# Altium PCB AnanasSTM32.PcbDoc
Units mm, origin at the board's own origin, x right, y up, seen from the top; angles counter-clockwise.
Board outline 41.4 x 42 mm, 2 copper layers (Top Layer, Bottom Layer); 57 components, 52 nets, 207 pads, 38 vias.
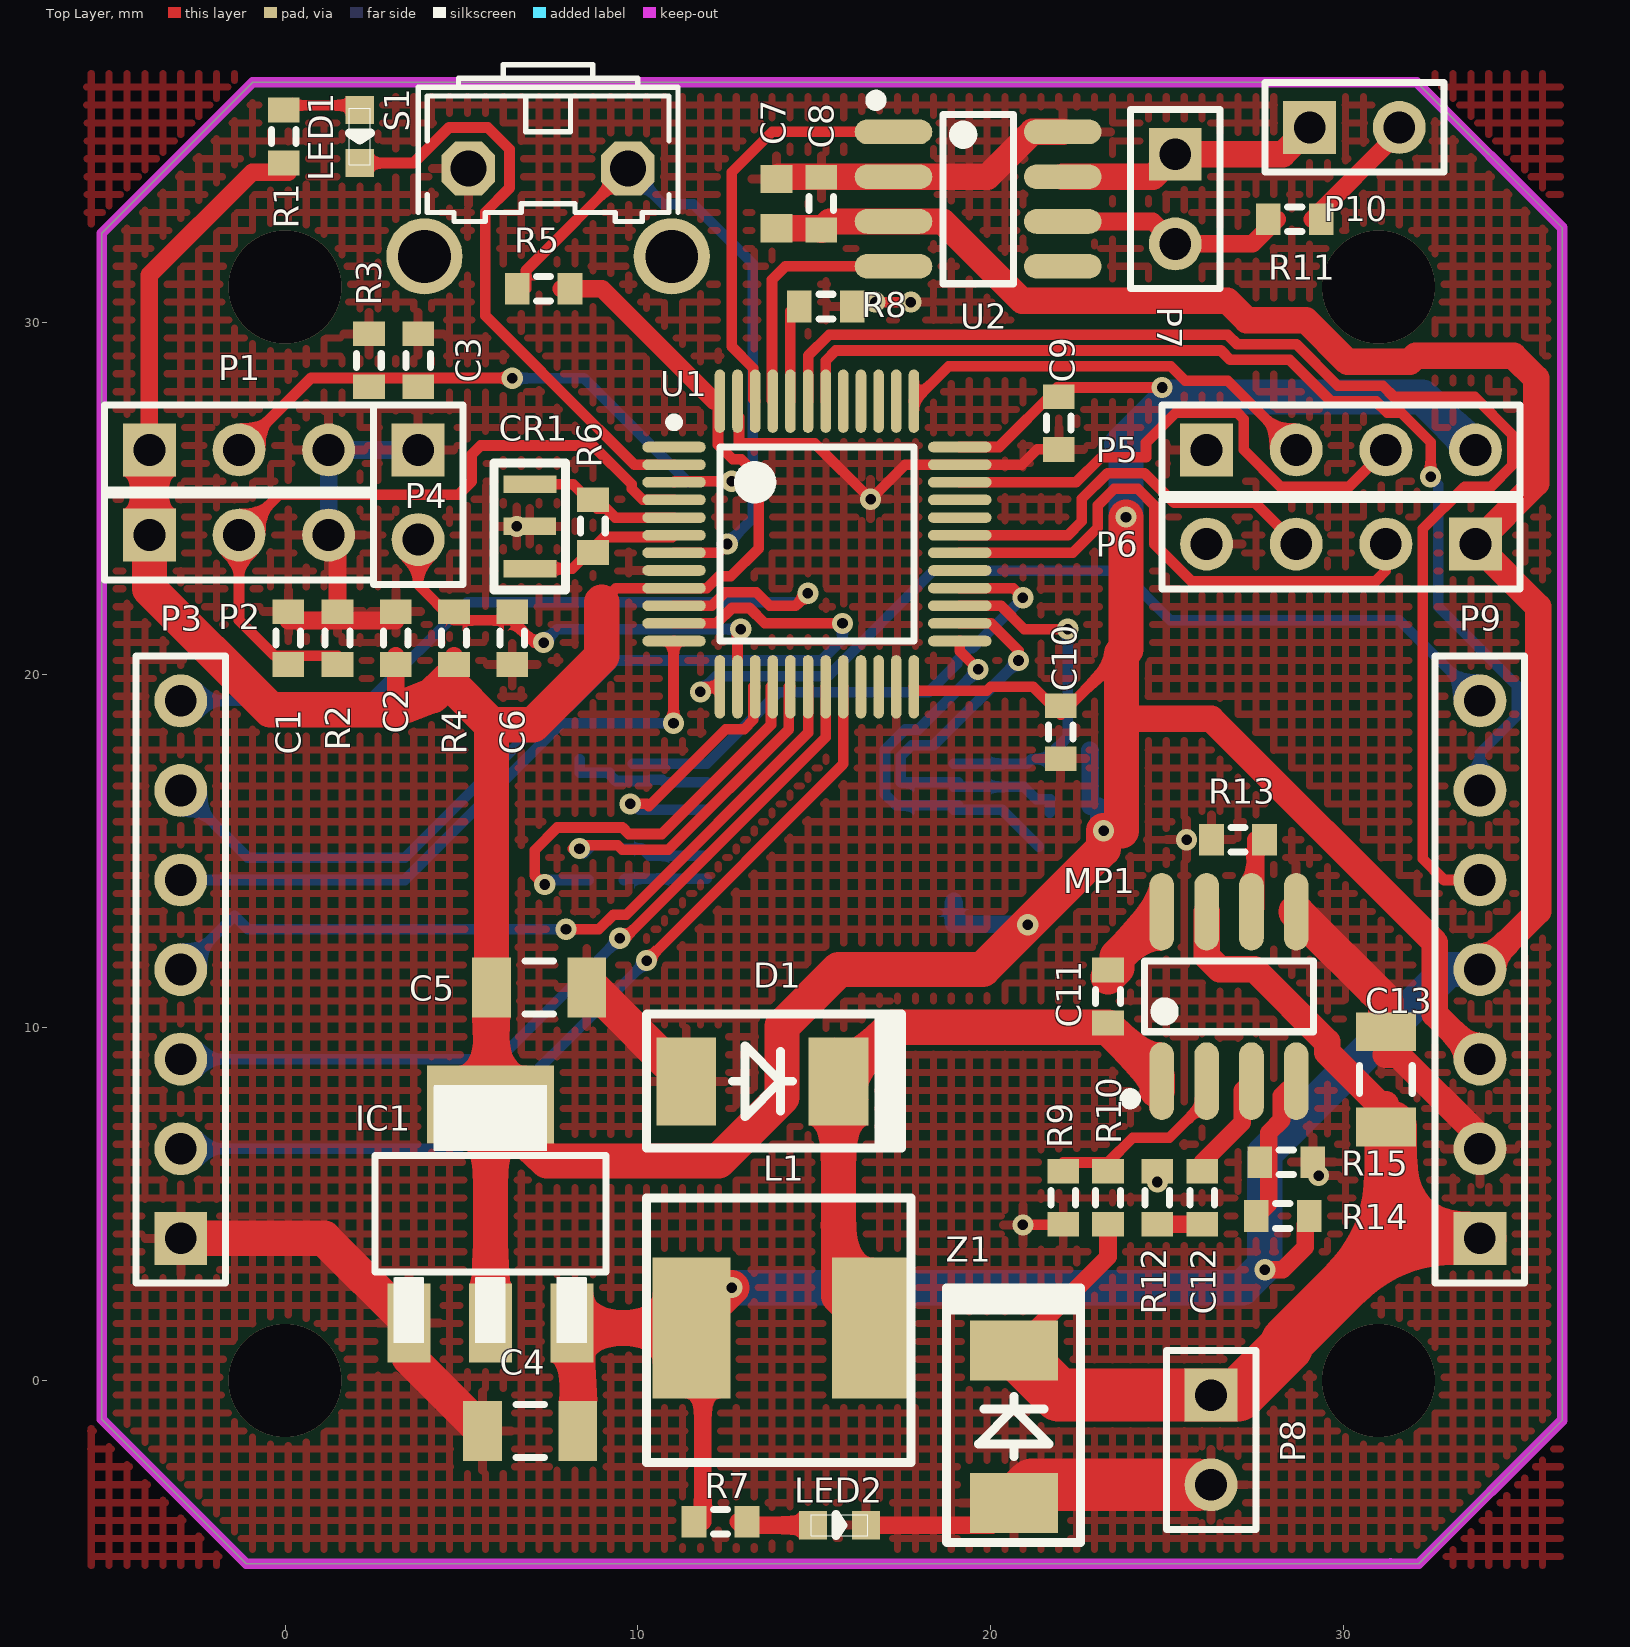
[diagram p0: Top Layer view]
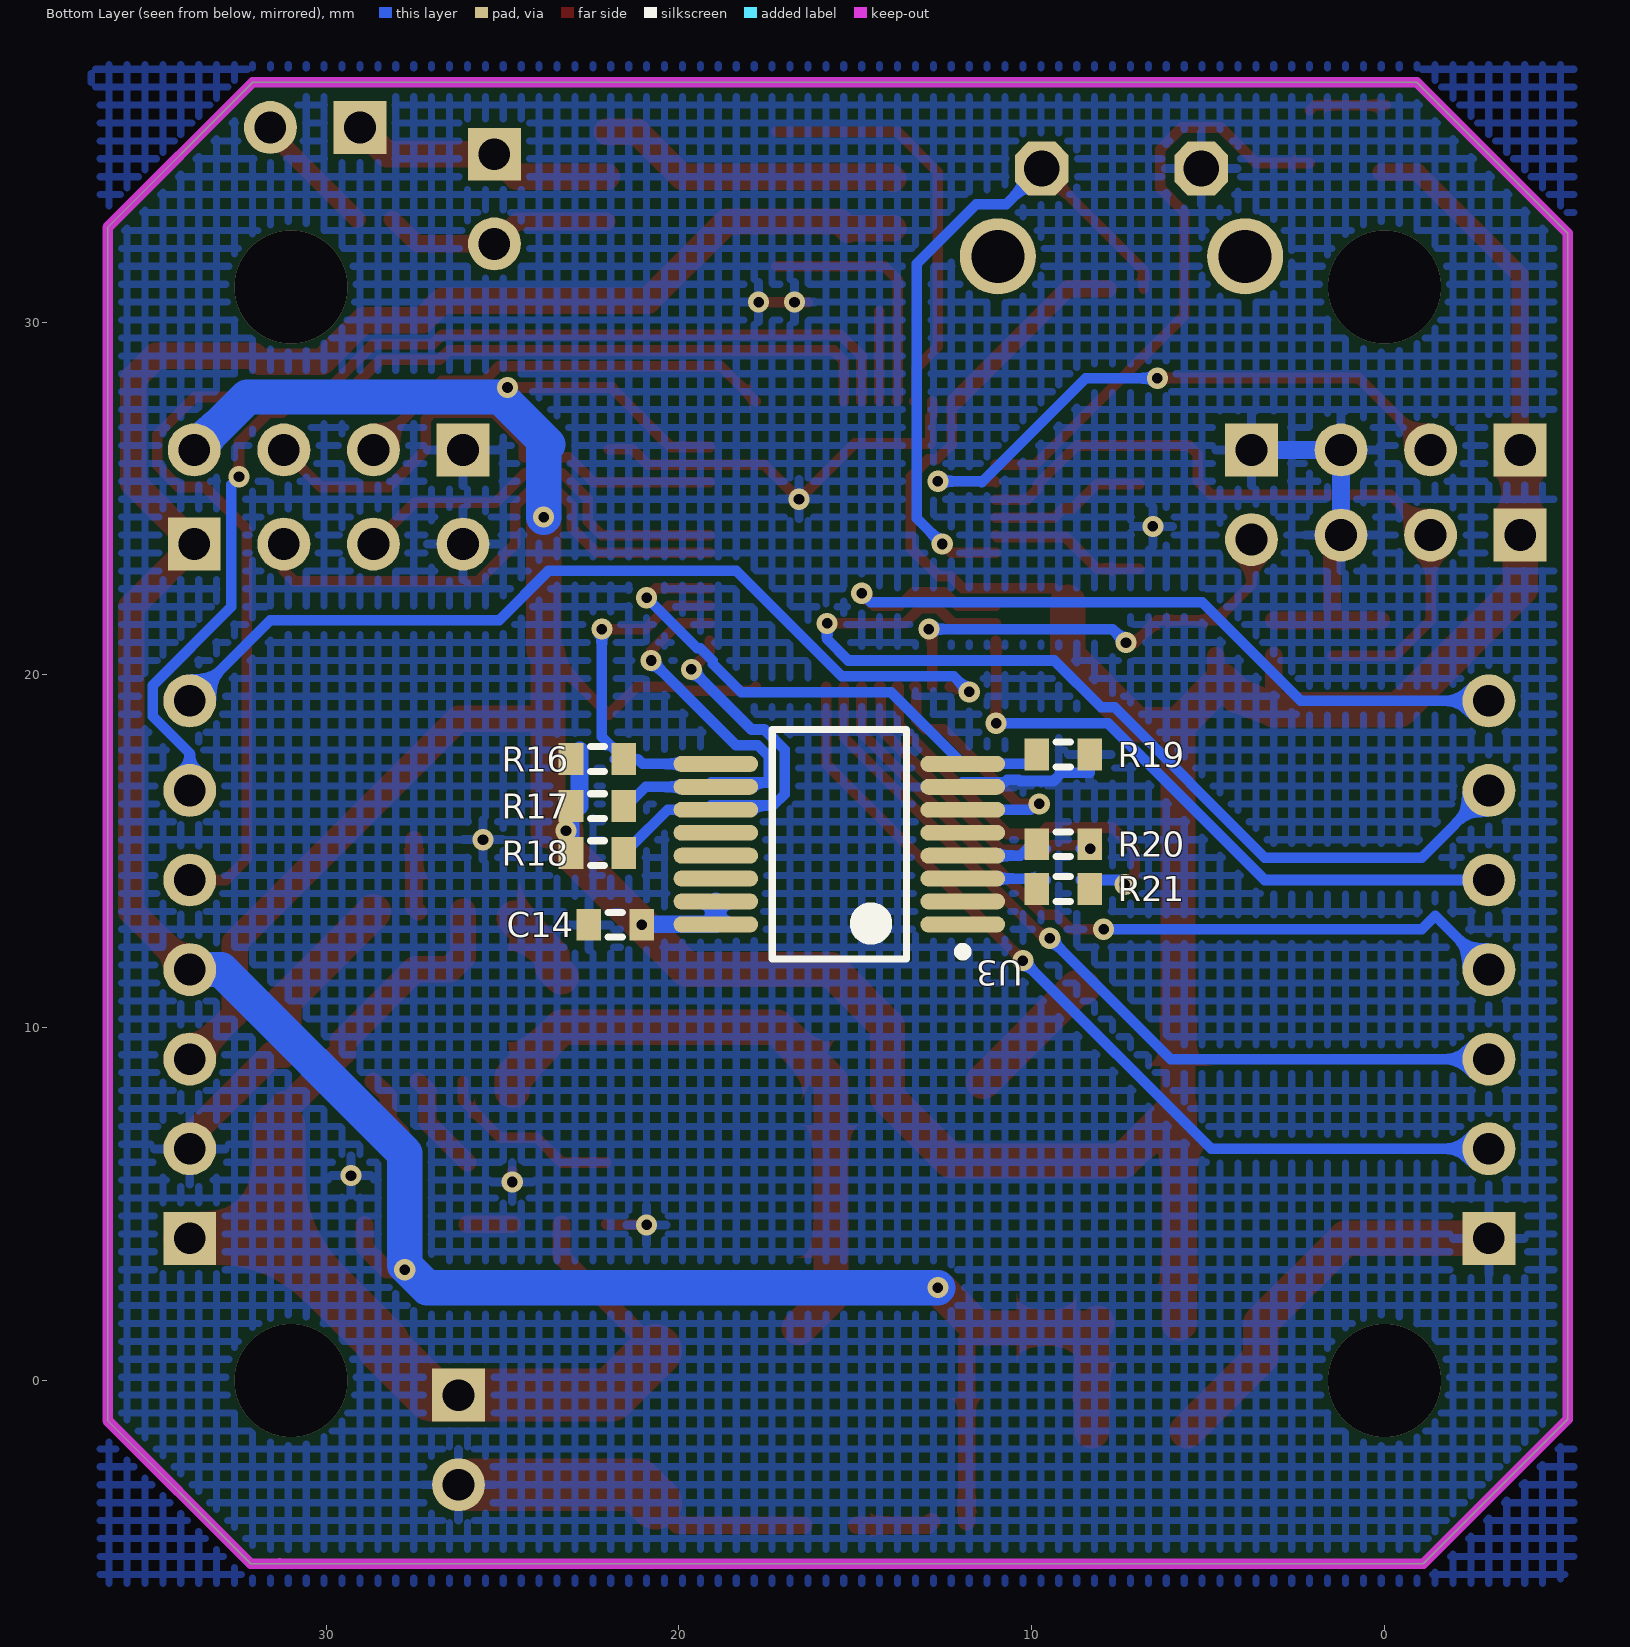
[diagram p1: Bottom Layer view, seen from below]

## Layer stack, top to bottom
Top Solder: solder mask 0.0102, Solder Resist, Dk 3.5
Top Layer: signal copper 0.0356
Dielectric 1: dielectric 0.32, FR-4, Dk 4.8
Bottom Layer: signal copper 0.0356
Bottom Solder: solder mask 0.0102, Solder Resist, Dk 3.5

## Board outline
-1.101,-5.2 -5.2,-1.101 -5.2,32.519 -0.919,36.8 32.083,36.8 36.2,32.683 36.2,-1.138 32.138,-5.2

## Design rules (kind name [scope] priority, off if disabled: settings)
Clearance [All] p1: gap=0.15 ignorepadtopadclearanceinfootprint=FALSE except(0: Arc-Hole Track-Hole SMDPad-Hole THPad-Hole Via-Hole Fill-Hole Poly-Hole Region-Hole Text-Hole)
DiffPairsRouting [All] p1: maxlimit=0.254 minlimit=0.254 mostfreqgap=0.254 toplayer_minwidth=0.381 toplayer_maxwidth=1 toplayer_prefwidth=0.381 bottomlayer_minwidth=0.381 bottomlayer_maxwidth=1 bottomlayer_prefwidth=0.381 maxuncoupledlength=12.7
HoleSize [All] p1 off: absolutevalues=TRUE maxlimit=5 minlimit=0.025 maxpercent=80.000 minpercent=20.000
HoleToHoleClearance [All] p1 off: gap=0.254 allowstackedmicrovias=TRUE
MinimumSolderMaskSliver [All] p1: minsoldermaskwidth=0.1
PolygonConnect [All] p1: connectstyle=Relief reliefconductorwidth=0.254 reliefentries=4 polygonreliefangle="90 Angle" airgapwidth=0.254
RoutingVias [All] p1: holewidth=0.3 width=0.6 viastyle="Through Hole" minholewidth=0.3 minwidth=0.6 maxholewidth=0.711 maxwidth=1.27
SilkToBoardRegionClearance [All] p1 off:
SilkToSilkClearance [All] p1 off: silktosilkclearance=0
SilkToSolderMaskClearance [IsPad] p1 off: minsilkscreentomaskgap=0 clearancetoexposedcopper=TRUE
SolderMaskExpansion [All] p1 off: expansion=0.1
Width [All] p1: maxlimit=1.5 minlimit=0.2 preferedwidth=0.203 toplayer_minwidth=0.203 minimp=50.000000 maximp=50.000000 favimp=50.000000
23 further rules are at their usual default settings.

## Classes and differential pairs
differential pair CAN: +CAN_P -CAN_N

## Components (designator, comment, footprint, x,y, rotation, side; value= is the part's Value field where it differs from the comment)
C1 "100pF" J1-0603 0.088,21.043 r270 top (schematic designator C12)
C2 "100pF" J1-0603 3.136,21.043 r270 top (schematic designator C9)
C3 "100pF" J1-0603 3.771,28.917 r270 top (schematic designator C14)
C4 "22uF" C1206 6.946,-1.436 r0 top (schematic designator C15)
C5 "22uf" C1206 7.2,11.137 r180 top (schematic designator C2)
C6 "10uF" J1-0603 6.438,21.043 r90 top (schematic designator C13)
C7 "10uF" 1608[0603] 13.931,33.362 r90 top (schematic designator C1)
C8 "100pF" J1-0603 15.201,33.362 r90 top (schematic designator C10)
C9 "4uF7" J1-0603 21.932,27.139 r90 top (schematic designator C7)
C10 "100pF" J1-0603 21.985,18.376 r90 top (schematic designator C8)
C11 "100pF" J1-0603 23.329,10.883 r270 top (schematic designator C4)
C12 "150pF" J1-0603 25.996,5.176 r90 top (schematic designator C6)
C13 "10uF" C1206 31.203,8.531 r270 top (schematic designator C3)
C14 "100pF" J1-0603 21.805,12.915 r180 bottom (schematic designator C11)
CR1 "8M" CSTCE8M 6.946,24.218 r270 top
D1 "SS22" SOD-6 11.378,8.47 r0 top (schematic designator D2)
IC1 "1117" SOT-223 3.517,1.612 r0 top
L1 "22uH" L74 13.931,1.485 r180 top
LED1 "LED-XH" LED-0603 2.12,34.505 r0 top (schematic designator LED2)
LED2 "LED-XH" LED-0603 16.471,-4.103 r90 top (schematic designator LED1)
MP1 "MP1584" LC-SOIC-8_150mil 26.758,10.883 r0 top
P1 "STOP2" HDR1X3 -3.849,26.377 r0 top (schematic designator P9)
P2 "STOP1" HDR1X3 -3.849,23.964 r0 top (schematic designator P7)
P3 "EXTENSION1" HDR1X7 -2.96,4.025 r90 top
P4 "TEMP" HDR1X2 3.771,26.377 r270 top (schematic designator P8)
P5 "Header 4" HDR1X4 26.123,26.377 r0 top (schematic designator P2)
P6 "UART" HDR1X4 33.743,23.71 r180 top (schematic designator P4)
P7 "CAN" HDR1X2 25.234,34.759 r270 top (schematic designator P5)
P8 "Header 2" HDR1X2 26.25,-0.42 r270 top (schematic designator P1)
P9 "EXTENSION2" HDR1X7 33.87,4.025 r90 top (schematic designator P6)
P10 "CAN" HDR1X2 29.044,35.521 r0 top
R1 "4K7" J1-0603 -0.039,35.263 r270 top (schematic designator R6)
R2 "10K" J1-0603 1.485,21.043 r270 top (schematic designator R21)
R3 "10K" J1-0603 2.374,28.917 r270 top (schematic designator R22)
R4 "4.7K" J1-0603 4.787,21.043 r270 top (schematic designator R19)
R5 "4K7" J1-0603 7.327,30.949 r0 top (schematic designator R23)
R6 "1M" J1-0603 8.724,24.218 r90 top (schematic designator R12)
R7 "4K7" J1-0603 12.341,-4.006 r0 top (schematic designator R1)
R8 "4K7" J1-0603 15.328,30.441 r180 top (schematic designator R7)
R9 "24.9K" J1-0603 22.059,5.176 r270 top (schematic designator R11)
R10 "100K" J1-0603 23.329,5.176 r90 top (schematic designator R8)
R11 "120R" J1-0603 28.624,32.92 r180 top (schematic designator R16)
R12 "100K" J1-0603 24.726,5.176 r90 top (schematic designator R14)
R13 "200K" J1-0603 27.012,15.328 r180 top (schematic designator R9)
R14 "210K" J1-0603 28.282,4.66 r180 top (schematic designator R13)
R15 "40.2K" J1-0603 28.383,6.184 r0 top
R16 "4K7" J1-0603 22.313,17.614 r0 bottom (schematic designator R4)
R17 "4K7" J1-0603 22.313,16.28 r0 bottom (schematic designator R3)
R18 "4K7" J1-0603 22.313,14.947 r0 bottom (schematic designator R2)
R19 "0R" J1-0603 9.105,17.741 r0 bottom (schematic designator R20)
R20 "0R" J1-0603 9.105,15.201 r0 bottom (schematic designator R18)
R21 "0R" J1-0603 9.105,13.931 r0 bottom (schematic designator R17)
S1 "OMRON SWITCH" B3F-31XX 7.454,33.108 r180 top
U1 "STM32F103C8T6TR" STM-LQFP48_N 15.074,23.71 r0 top
U2 "TJA1050" LC-SOIC-8_150mil 19.646,33.489 r270 top
U3 "AS5145B" SSOP16_M 15.455,15.201 r0 bottom
Z1 "SMBJ33CA" D1210 20.662,-3.468 r90 top

## Footprints (in the part's own frame and the unit in brackets; to place one, negate y for a bottom-side part, rotate by r counter-clockwise, add the part's x,y. Pads: shape width x height; smd on the part's side, far side on the other; paste and mask are expansions set on the pad)
1608[0603] [mm] "Chip Capacitor, Body 1.6x0.8mm, IPC High Density"
  rect 0.8x0.9 smd: 1(-0.7,0) 2(0.7,0)
  body extent -0.87,-0.48 0.87,0.48, height 1.3
B3F-31XX [mil]
  oct 60x60 hole 40: 1(-89,-49) 2(89,-49)
  round 85 hole 59: 3(-138,49) 4(138,49)
  silkscreen extent -145,-165 145,10
C1206 [mm] "Chip Capacitor, Body 3.2x1.6mm, IPC High Density"
  rect 1.1x1.7 smd: 1(-1.35,0) 2(1.35,0)
  silkscreen extent -0.4,-0.75 0.4,0.75, body extent -1.7,-0.9 1.7,0.9, height 1.3
CSTCE8M [mm]
  rect 0.5x1.5 smd: 1(-1.192,0) 2(0.008,-0.013) 3(1.208,0)
  silkscreen extent -1.79,-1.03 1.81,1
D1210 [mm]
  rect 1.7x2.5 smd: A(-0.005,-0.004) K(4.313,-0.004)
  silkscreen extent -1.13,-1.89 6.09,1.91
HDR1X2 [mm] "Connector; Header; 2 Position"
  rect 1.5x1.5 hole 0.9: 1(0,0)
  round 1.5 hole 0.9: 2(2.54,0)
  silkscreen extent -1.27,-1.27 3.81,1.27
HDR1X3 [mm] "Connector; Header; 3 Position"
  rect 1.5x1.5 hole 0.9: 1(0,0)
  round 1.5 hole 0.9: 2(2.54,0) 3(5.08,0)
  silkscreen extent -1.27,-1.27 6.35,1.27
HDR1X4 [mm] "Connector; Header; 4 Position"
  rect 1.5x1.5 hole 0.9: 1(0,0)
  round 1.5 hole 0.9: 2(2.54,0) 3(5.08,0) 4(7.62,0)
  silkscreen extent -1.27,-1.27 8.89,1.27
HDR1X7 [mm] "Connector; Header; 7 Position"
  rect 1.5x1.5 hole 0.9: 1(0,0)
  round 1.5 hole 0.9: 2(2.54,0) 3(5.08,0) 4(7.62,0) 5(10.16,0) 6(12.7,0) 7(15.24,0)
  silkscreen extent -1.27,-1.27 16.51,1.27
J1-0603 [mm] "Chip Resistor, Body 1.6x0.8mm, IPC High Density"
  rect 0.7x0.9 smd: 1(-0.75,0) 2(0.75,0)
  silkscreen extent -0.2,-0.35 0.2,0.35, body extent -0.85,-0.48 0.85,0.48, height 0.9
L74 [mm]
  rect 2.2x4 smd: 1(-2.667,0) 2(2.413,0)
  silkscreen extent -3.81,-3.68 3.68,3.81
LC-SOIC-8_150mil [mm]
  oval 0.7x2.2 smd: 1(-1.905,-2.4) 2(-0.635,-2.4) 3(0.635,-2.4) 4(1.905,-2.4) 5(1.905,2.4) 6(0.635,2.4) 7(-0.635,2.4) 8(-1.905,2.4)
  silkscreen extent -2.95,-3.05 2.4,1
LED-0603 [mm]
  rect 0.8x0.8 smd: A(-0.004,1.506) K(-0.004,0.007)
  silkscreen extent -0.3,-0.04 0.3,1.56
SOD-6 [mm]
  rect 1.7x2.5 smd: A(-0.007,0.004) K(4.311,0.004)
  silkscreen extent -1.13,-1.88 6.09,1.92
SOT-223 [mil]
  rect 48x88 smd: 1(-0.33,0.37) 2(90.67,0.37) 3(181.67,0.37)
  rect 141.73x86.61 smd: 2(90.67,244.38)
  silkscreen extent -39,-22 221,266
SSOP16_M [mm] "SOP, 16-Leads, Body 6.2x5.3mm, Pitch 0.65mm, IPC Low Density"
  oval 2.4x0.45 smd: 1(-3.5,2.275) 2(-3.5,1.625) 3(-3.5,0.975) 4(-3.5,0.325) 5(-3.5,-0.325) 6(-3.5,-0.975) 7(-3.5,-1.625) 8(-3.5,-2.275) 9(3.5,-2.275) 10(3.5,-1.625) 11(3.5,-0.975) 12(3.5,-0.325) 13(3.5,0.325) 14(3.5,0.975) 15(3.5,1.625) 16(3.5,2.275)
  silkscreen extent -3.62,-3.25 1.9,3.25, body extent -2.7,-3.25 2.7,3.25, height 2
STM-LQFP48_N [mm] "QFP, 48-Leads, Body 7x7mm, Pitch 0.5mm, IPC Medium Density"
  oval 1.8x0.3 smd: 1(-4.05,2.75) 2(-4.05,2.25) 3(-4.05,1.75) 4(-4.05,1.25) 5(-4.05,0.75) 6(-4.05,0.25) 7(-4.05,-0.25) 8(-4.05,-0.75) 9(-4.05,-1.25) 10(-4.05,-1.75) 11(-4.05,-2.25) 12(-4.05,-2.75) 25(4.05,-2.75) 26(4.05,-2.25) 27(4.05,-1.75) 28(4.05,-1.25) 29(4.05,-0.75) 30(4.05,-0.25) 31(4.05,0.25) 32(4.05,0.75) 33(4.05,1.25) 34(4.05,1.75) 35(4.05,2.25) 36(4.05,2.75)
  oval 0.3x1.8 smd: 13(-2.75,-4.05) 14(-2.25,-4.05) 15(-1.75,-4.05) 16(-1.25,-4.05) 17(-0.75,-4.05) 18(-0.25,-4.05) 19(0.25,-4.05) 20(0.75,-4.05) 21(1.25,-4.05) 22(1.75,-4.05) 23(2.25,-4.05) 24(2.75,-4.05) 37(2.75,4.05) 38(2.25,4.05) 39(1.75,4.05) 40(1.25,4.05) 41(0.75,4.05) 42(0.25,4.05) 43(-0.25,4.05) 44(-0.75,4.05) 45(-1.25,4.05) 46(-1.75,4.05) 47(-2.25,4.05) 48(-2.75,4.05)
  silkscreen extent -4.17,-2.75 2.75,3.57, body extent -3.5,-3.5 3.5,3.5, height 1.6

## Part data
C1 C2 C3 C4 C5 C6 C7 C8 C9 C10 C11 C12 C13 C14: library part "Cap Semi", "Capacitor (Semiconductor SIM Model)"
CR1: library part CSTCE8M, "陶振"
D1: library part 1N4001, "二极管"
IC1: "三端稳压器"
L1: library part L, "电流互感器"
LED1 LED2: "发光二极管"
P1 P2: library part "Header 3", "Header, 3-Pin"
P3 P9: library part "Header 7", "Header, 7-Pin"
P4 P7 P10: library part "Header 2", "Header, 2-Pin"
P5: "Header, 4-Pin"
P6: library part "Header 4", "Header, 4-Pin"
P8: "Header, 2-Pin"
R1 R2 R3 R4 R5 R6 R7 R8 R9 R10 R11 R12 R13 R14 R15 R16 R17 R18 R19 R20 R21: library part Res3, "Resistor"
S1: library part 31-XX
U1: "ARM Cortex-M3 32-bit MCU, 64 KB Flash, 20 KB Internal RAM, 37 I/Os, 48-pin LQFP, -40 to 85 degC, Tape and Reel"
Z1: library part 1N4733A, "稳压管"

## Via types
v1: diameter 0.6, hole 0.3, Top Layer to Bottom Layer, 34 vias
v2: diameter 3.2, hole 3.2, Top Layer to Bottom Layer, 4 vias

## Nets (pads, with @x,y where several pads share a name; then routed paths per layer and width w, separated by ;. In a path a pad name is that pad's centre, name@x,y a point inside that pad or via, vN(x,y) a via of type N, cw(c..) or ccw(c..) an arc to the next point about the centre after c; other vN are vias at no path point)
3V3: C2.2 C5.2 C9.2 C10.2 C14.2 IC1.2 P1.1 P2.1 P5.4 P9.3 R1.2 R4.2 R5.2 R16.2 R17.2 R18.2 U1.9 U1.24 U1.36 U1.48 U3.15 U3.16 | length 146.6
  Top Layer w0.3: 8.978,22.059 9.379,22.46 U1.9 11.957,22.46 12.294,22.797 12.637,22.797 13.423,23.583 13.423,25.615 12.928,26.11 12.688,26.11 12.27,26.528 U1.48@12.27,27.76 ; U1.24 17.93,19.554 19.895,19.554 20.001,19.66 21.201,19.66 21.985,18.876 23.71,20.601 ; U1.36 20.238,26.46 21.885,28.107 21.885,28.147 v1(24.861,28.147)
  Top Layer w0.5: P1.1 -3.849,31.338 -0.936,34.251 R1.2@0.088,34.251 ; 3.136,19.011 C2.2@3.136,20.543 ; 4.66,19.773 4.787,19.9 R4.2@4.787,20.543 ; R5.2@7.827,30.949 8.981,30.949 12.17,27.76
  Top Layer w0.75: 23.71,18.757 26.25,18.757 32.595,12.412 32.595,10.38 P9.3
  Top Layer w1: P1.1 P2.1 -3.849,22.44 -0.42,19.011 3.136,19.011 4.169,19.409 4.596,19.836 5.85,18.583 ; IC1.2@5.82,1.621 IC1.2@5.82,7.819 ; 8.978,22.059 8.978,20.535 7.026,18.583 5.85,18.583 ; v1(23.202,15.582) 23.202,15.074 19.773,11.645 15.693,11.645 14.085,10.037 14.085,8.022 12.282,6.219 7.42,6.219 IC1.2@5.82,7.819 ; 23.71,15.582 23.71,18.757 23.71,20.601 23.837,20.728 v1(23.837,24.472) ; IC1.2@5.82,7.819 5.85,7.849 C5.2 5.85,18.583
  Bottom Layer w0.5: U3.15 U3.16 C14.2@21.04,12.926 ; R16.2@22.813,17.614 22.813,17.86 22.821,17.852 R17.2@22.821,16.28 ; R18.2 R17.2
  Bottom Layer w1: v1(23.837,24.472) 23.837,26.403 23.71,26.53 25.061,27.881 32.239,27.881 P5.4
  other v1: 21.051,12.915
5V: C4.2 C7.1 C8.1 IC1.3 L1.2 P6.1 P9.4 R7.1 R14.1 U2.3 | length 85
  Top Layer w0.5: L1.2 11.841,1.162 R7.1@11.841,-4.006 ; v1(27.774,3.136) 28.282,3.136 28.917,3.771 R14.1@28.917,4.406
  Top Layer w0.75: C7.1 15.151,32.662 C8.1 15.443,32.854 U2.3 18.641,32.854 20.89,30.605 26.713,30.605 27.264,30.054 28.941,30.054 30.12,28.875 31.88,28.875 32.049,29.044 34.828,29.044 35.468,28.404 35.468,25.435 P6.1 35.525,21.928 35.525,13.3 P9.4
  Top Layer w1: IC1.3 IC1.3@8.296,1.457 ; C4.2 IC1.3@8.296,1.457 ; v1(12.661,2.628) L1.2 8.324,1.485 IC1.3@8.296,1.457 ; P9.4 P9.4@34.026,11.645
  Bottom Layer w1: v1(12.661,2.628) 27.139,2.628 v1@27.71,3.199 ; v1@27.774,3.263 27.774,6.438 32.981,11.645 P9.4
12V: C13.2 MP1.7 P8.1 P9.1 R10.1 Z1.K | length 31.7
  Top Layer w0.5: Z1.K 23.329,3.508 R10.1
  Top Layer w0.75: MP1.7 26.123,12.026 26.491,11.658 27.475,11.658 29.538,9.595 29.538,9.304 31.011,7.831 31.203,7.831
  Top Layer w1.5: Z1.K 21.931,-0.42 27.012,-0.42 28.396,0.964 28.396,1.079 31.342,4.025 ; C13.2@31.342,7.188 31.342,4.025 ; P9.1 31.342,4.025
5145CLK: R17.1 U1.26 U3.10 | length 12.5
  Top Layer w0.3: U1.26 20.01,21.46 20.789,20.681 v1(20.789,20.408)
  Bottom Layer w0.3: v1(20.789,20.408) 18.382,18.001 17.763,18.001 17.455,17.693 17.455,16.951 19.08,16.951 U3.10 20.942,16.826 21.297,16.471 21.686,16.471 21.678,16.463 R17.1@21.678,16.09
5145CS: R18.1 U1.25 U3.11 | length 11.1
  Top Layer w0.3: U1.25 19.124,20.676 v1(19.646,20.154)
  Bottom Layer w0.3: v1(19.646,20.154) 17.943,18.451 17.576,18.451 17.005,17.88 17.005,16.621 17.325,16.301 19.08,16.301 U3.11 20.322,16.176 R18.1@21.364,15.133
5145DOUT: R16.1 U1.27 U3.9 | length 10.2
  Top Layer w0.3: U1.27 20.293,21.96 20.956,21.297 v1(22.186,21.297)
  Bottom Layer w0.3: U3.9 21.032,17.476 21.17,17.614 R16.1@21.551,17.614 ; R16.1@21.813,17.614 R16.1@21.551,17.614 ; v1(22.186,21.297) 22.186,18.249 R16.1@21.551,17.614
BOOT0: R8.2 U1.44 | length 2.6
  Top Layer w0.3: U1.44 R8.2@14.324,30.314
CAN_N: P7.1 P10.1 U2.7 | length 7.6
  Top Layer w0.75: U2.7 24.599,34.124 P7.1 28.282,34.759 P10.1
CAN_P: P7.2 R11.2 U2.6 | length 6.6
  Top Layer w0.5: U2.6 24.599,32.854 P7.2 27.423,32.219 R11.2@28.124,32.92
CAN_RX: U1.45 U2.4 | length 7.1
  Top Layer w0.3: U1.45 13.801,27.783 13.801,31.2 14.185,31.584 U2.4
CAN_TX: U1.46 U2.1 | length 11.8
  Top Layer w0.3: U1.46 13.274,27.81 13.274,28.696 12.661,29.309 12.661,34.251 13.804,35.394 U2.1
DIR_OUT: P3.4 U1.18 | length 22.2
  Top Layer w0.3: v1(7.962,12.788) 8.891,12.788 9.308,13.205 9.664,13.205 14.824,18.364 U1.18
  Bottom Layer w0.3: P3.4 -1.436,13.169 -1.055,12.788 v1(7.962,12.788)
ENABLE_OUT: P3.2 U1.20 | length 25.5
  Top Layer w0.3: v1(10.248,11.899) 15.824,17.475 U1.20
  Bottom Layer w0.3: P3.2 4.914,6.565 v1(10.248,11.899)
ENCODER_A: R21.1 U1.16 | length 11.9
  Top Layer w0.3: v1(7.359,14.058) 7.327,14.058 7.073,14.312 7.073,15.034 7.713,15.674 9.561,15.674 9.745,15.49 10.677,15.49 13.774,18.587 13.774,19.66 U1.16
  Bottom Layer w0.3: v1(7.359,14.058) 7.486,14.185 R21.1@8.605,14.185
ENCODER_B: R20.1 U1.17 | length 9.5
  Top Layer w0.3: v1(8.343,15.074) 8.148,15.074 8.241,15.167 9.432,15.167 9.559,15.04 10.863,15.04 14.274,18.451 14.274,19.66 U1.17
  Bottom Layer w0.3: v1(8.343,15.074) 8.351,15.074 8.478,14.947 R20.1@8.605,15.074
GND: C1.1 C2.1 C3.1 C4.1 C5.1 C6.1 C7.2 C8.2 C9.1 C10.1 C13.1 C14.1 CR1.2 D1.A IC1.1 LED2.K MP1.5 P1.3 P2.3 P3.1 P4.1 P5.1 P6.4 P8.2 P9.2 R2.1 R3.1 R8.1 R9.2 R12.2 R13.2 R15.2 R19.1 S1.2 U1.8 U1.23 U1.35 U1.47 U2.2 U2.8 U3.7 Z1.A | length 71.5
  Top Layer w0.3: U1.47 12.824,27.357 12.874,27.307 12.874,26.56 15.018,26.56 v1(16.598,24.98) 17.578,25.96 U1.35 20.88,25.96 21.317,26.397 C9.1@21.985,26.397 ; R8.1@16.344,30.568 v1(16.725,30.568) v1(17.741,30.568) ; v1(20.916,4.406) 22.039,4.406 R9.2 ; v1(24.726,5.624) R12.2
  Top Layer w0.5: C1.1@0.088,21.543 R2.1@1.485,21.543 ; P2.3 1.485,23.71 R2.1@1.485,21.543 ; C2.1@3.136,21.543 R2.1@1.485,21.543 ; LED2.K 20.032,-4.107 Z1.A
  Top Layer w0.75: C7.2 13.993,34.124 U2.2 19.911,34.124 21.181,35.394 U2.8 ; 31.203,9.231 31.542,9.231 33.87,6.904 P9.2
  Top Layer w1: P3.1 1.105,4.025 IC1.1 3.509,0.651 C4.1 ; C5.1 8.708,11.137 D1.A ; MP1.5 31.203,10.743 C13.1
  Top Layer w1.5: Z1.A 21.179,-2.96 P8.2@25.869,-2.96
  Bottom Layer w0.3: R19.1@8.355,17.614 8.355,17.221 9.205,17.221 9.205,17.167 9.381,16.991 10.329,16.991 10.364,17.026 10.688,17.026 10.763,16.951 11.955,16.951 U3.7
  Bottom Layer w0.5: P2.3 P1.3 P4.1
  other v1: 29.298,5.803 25.556,15.328 6.565,24.21
LED: LED1.K U1.2 | length 17
  Top Layer w0.3: LED1.K 3.638,34.512 4.645,35.519 5.742,35.519 6.359,34.901 6.359,33.804 5.676,33.121 5.676,30.187 8.909,26.954 8.91,26.954 9.904,25.96 U1.2
MODE_INDEX: U1.15 U3.6 | length 7.8
  Top Layer w0.3: v1(9.785,16.344) 10.248,16.344 10.311,16.28 12.491,18.46 13.01,18.46 13.274,18.724 13.274,19.66 U1.15
  Bottom Layer w0.3: v1(9.785,16.344) 9.867,16.344 10.035,16.176 U3.6
NetC11_1: C11.1 MP1.8 | length 2.3
  Top Layer w0.5: C11.1@23.329,11.383 C11.1@23.329,11.437
  Top Layer w1: C11.1@23.329,11.437 23.583,11.691 23.583,12.013 MP1.8@24.669,13.099
NetC11_2: C11.2 D1.K L1.1 MP1.1 | length 18
  Top Layer w1: L1.1 15.689,2.394 D1.K 17.222,10.007 23.329,10.007 24.726,8.61 MP1.1@24.726,8.216
NetC12_1: C12.1 R12.1 | length 1.3
  Top Layer w0.5: R12.1 C12.1
NetC12_2: C12.2 MP1.3 | length 2.9
  Top Layer w0.5: C12.2@25.996,6.176 27.129,7.309 27.129,8.219 MP1.3
NetCR1_1: CR1.1 R6.2 U1.5 | length 4.5
  Top Layer w0.3: CR1.1 8.159,25.41 8.851,24.718 9.105,24.718 9.363,24.46 U1.5
NetCR1_3: CR1.3 R6.1 U1.6 | length 4.5
  Top Layer w0.3: CR1.3 8.143,23.01 9.043,23.91 10.974,23.91 U1.6
NetLED1_A: LED1.A R1.1 | length 2.2
  Top Layer w0.3: R1.1@-0.039,36.148 1.979,36.148 LED1.A
NetLED2_A: LED2.A R7.2 | length 2.2
  Top Layer w0.5: R7.2@12.841,-4.006 12.943,-4.107 LED2.A
NetMP1_2: MP1.2 R9.1 R10.2 | length 5.3
  Top Layer w0.3: R9.1@22.059,6.176 23.329,6.176 24.033,6.88 25.066,6.88 26.123,7.937 MP1.2
NetMP1_4: MP1.4 R14.2 R15.1 | length 4.3
  Top Layer w0.5: R14.2 27.883,5.011 27.883,6.184 27.883,7.015 28.247,7.379 28.247,8.067 MP1.4
NetMP1_6: MP1.6 R13.1 | length 2.1
  Top Layer w0.5: MP1.6 27.512,13.402 R13.1@27.512,15.328
NetP10_2: P10.2 R11.1 | length 3.6
  Top Layer w0.5: R11.1@29.124,32.92 31.584,35.38 P10.2
NetR20_2: R20.2 U3.4 | length 2.4
  Bottom Layer w0.3: R20.2@9.605,15.074 10.121,15.074 10.319,14.876 U3.4
NetR21_2: R21.2 U3.3 | length 2.4
  Bottom Layer w0.3: R21.2@9.605,14.185 9.646,14.226 U3.3
PDIO: R19.2 U1.28 U3.8 | length 15
  Top Layer w0.3: U1.28 20.642,22.46 v1(20.916,22.186)
  Bottom Layer w0.3: R19.2@9.855,17.476 U3.8 13.987,19.508 18.238,19.508 19.046,20.316 19.046,20.403 19.397,20.754 19.484,20.754 v1(20.916,22.186)
PWM1: P3.7 U1.10 | length 23.3
  Top Layer w0.3: U1.10 12.093,21.96 12.48,22.347 13.35,22.347 13.737,21.96 14.467,21.96 v1(14.82,22.313)
  Bottom Layer w0.3: P3.7 2.374,19.265 5.168,22.059 14.566,22.059 v1(14.82,22.313)
PWM2: P3.6 U1.11 | length 27.7
  Top Layer w0.3: U1.11 12.229,21.46 12.666,21.897 13.164,21.897 13.6,21.46 v1(15.8,21.46)
  Bottom Layer w0.3: P3.6 -1.055,14.82 3.389,14.82 7.649,19.08 8.031,19.08 9.359,20.408 15.201,20.408 15.8,21.007 v1(15.8,21.46)
PWM3: P3.5 U1.12 | length 18.1
  Top Layer w0.3: v1(11.01,18.63) 11.01,20.946 U1.12
  Bottom Layer w0.3: P3.5 3.39,14.185 7.835,18.63 v1(11.01,18.63)
PWM4: P9.7 U1.13 | length 25.7
  Top Layer w0.3: v1(11.772,19.519) 11.913,19.66 U1.13
  Bottom Layer w0.3: v1(11.772,19.519) 12.211,19.958 15.387,19.958 18.377,22.948 23.698,22.948 25.095,21.551 31.584,21.551 P9.7
RST: R5.1 S1.1 U1.7 | length 19.1
  Top Layer w0.3: R5.1@6.827,30.949 6.827,31.465 S1.1 ; U1.7 12.284,23.46 v1(12.534,23.71)
  Bottom Layer w0.3: S1.1 10.72,33.347 11.574,33.347 13.261,31.66 13.261,24.437 v1(12.534,23.71)
SCL: P9.6 U1.42 | length 30.8
  Top Layer w0.3: U1.42 15.324,28.91 15.611,29.197 26.53,29.197 26.798,28.929 28.475,28.929 29.654,27.75 30.927,27.75 31.25,27.427 31.638,27.427 32.473,26.592 v1(32.473,25.615)
  Bottom Layer w0.3: v1(32.473,25.615) 32.693,25.395 32.693,21.927 34.92,19.7 34.92,18.83 33.87,17.78 P9.6
SDA: P9.5 U1.43 | length 38.1
  Top Layer w0.3: U1.43 14.824,29.046 15.425,29.647 26.717,29.647 26.985,29.379 28.661,29.379 29.84,28.2 31.113,28.2 31.436,27.877 33.728,27.877 34.793,26.812 34.793,25.942 34.178,25.327 33.436,25.327 32.253,24.144 32.253,14.786 32.854,14.185 P9.5
STEP_OUT: P3.3 U1.19 | length 23.5
  Top Layer w0.3: v1(9.486,12.534) 9.63,12.534 15.324,18.228 U1.19
  Bottom Layer w0.3: P3.3 6.057,9.105 v1(9.486,12.534)
STOP1: C1.2 P2.2 R2.2 U1.4 | length 20.2
  Top Layer w0.3: R2.2@1.485,20.543 -0.301,20.543 -1.309,21.551 P2.2 -0.166,25.107 4.914,25.107 5.295,25.488 5.295,26.25 5.549,26.504 8.724,26.504 9.824,25.404 9.824,25.274 10.138,24.96 U1.4
STOP2: C3.2 P1.2 R3.2 U1.3 | length 17.7
  Top Layer w0.3: P1.2 0.731,28.417 2.247,28.417 3.517,28.417 v1@6.43,28.417 ; U1.3 11.052,25.488 v1(12.661,25.488)
  Bottom Layer w0.3: v1(6.438,28.409) 8.47,28.409 11.419,25.46 11.447,25.488 v1(12.661,25.488)
SWCLK: P5.2 U1.37 | length 12.2
  Top Layer w0.3: U1.37 18.811,28.747 25.109,28.747 25.517,28.34 26.721,28.34 28.663,26.398 P5.2
SWDIO: P5.3 U1.34 | length 14.9
  Top Layer w0.3: U1.34 22.421,25.46 23.133,26.172 24.404,26.172 24.404,26.582 25.249,27.427 26.997,27.427 27.173,27.251 27.173,26.382 28.228,25.327 30.153,25.327 P5.3
SYSC: U1.29
TEMP1: C6.2 P4.2 R4.1 U1.14 | length 12.9
  Top Layer w0.3: P4.2 3.771,22.559 4.787,21.543 6.438,21.543 7.065,20.916 v1(7.327,20.916) ; U1.14 12.824,21.206 v1(12.915,21.297)
  Bottom Layer w0.3: v1(7.327,20.916) 7.708,21.297 v1(12.915,21.297)
UART_RX: P6.3 U1.31 | length 11.5
  Top Layer w0.3: U1.31 22.194,23.96 22.587,24.353 22.587,24.99 23.319,25.722 24.355,25.722 25.2,24.877 27.496,24.877 P6.3
UART_TX: P6.2 U1.30 | length 15.8
  Top Layer w0.3: U1.30 22.33,23.46 23.037,24.167 23.037,24.803 23.506,25.272 24.168,25.272 24.637,24.803 24.637,23.711 25.688,22.66 30.915,22.66 31.203,22.948 P6.2
USB_DM: U1.32
USB_DP: U1.33
USBBOOT: U1.38
pads on no net: S1.3 S1.4 U1.1 U1.21 U1.22 U1.39 U1.40 U1.41 U2.5 U3.1 U3.2 U3.5 U3.12 U3.13 U3.14
copper on no net:
  other v2: 0,0 31,0 0,31 31,31

## Polygon pours and split planes (outlines as drawn)
GND on Top Layer "GND_L01_P016" (hatched 90Degree grid 0.508 track 0.203, pour order 16): -5.627,37.045 36.156,37.045 36.156,-5.373 36.537,-5.754 36.029,-5.246 -5.5,-5.246
GND on Bottom Layer "GND_L02_P018" (hatched 90Degree grid 0.508 track 0.203, pour order 18): -5.373,37.299 36.41,37.299 36.791,36.918 36.41,36.537 36.41,-5.754 -4.865,-5.754 -5.373,-5.246

## Keep-outs
Keep-Out Layer:
  lines w0.254: 31.33,-5.2 31.33,-5.163 ; 31.33,36.8 31.365,36.8
  lines w0.3: -5.2,-1.101 -5.2,32.519 -0.919,36.8 32.083,36.8 36.2,32.683 36.2,-1.138 32.138,-5.2 -1.101,-5.2 -5.2,-1.101

## Dimensions
-5.2,-5.2 to -5.2,36.8 on Mechanical 1
-5.2,-5.2 to 36.2,-5.2 on Mechanical 1